# Altium PCB Plytka_srodkowa_ESP_SD.PcbDoc
Units mm, origin at the board's own origin, x right, y up, seen from the top; angles counter-clockwise.
Board outline 49 x 49 mm, 2 copper layers (Top Layer, Bottom Layer); 5 components, 16 nets, 50 pads, 53 vias.
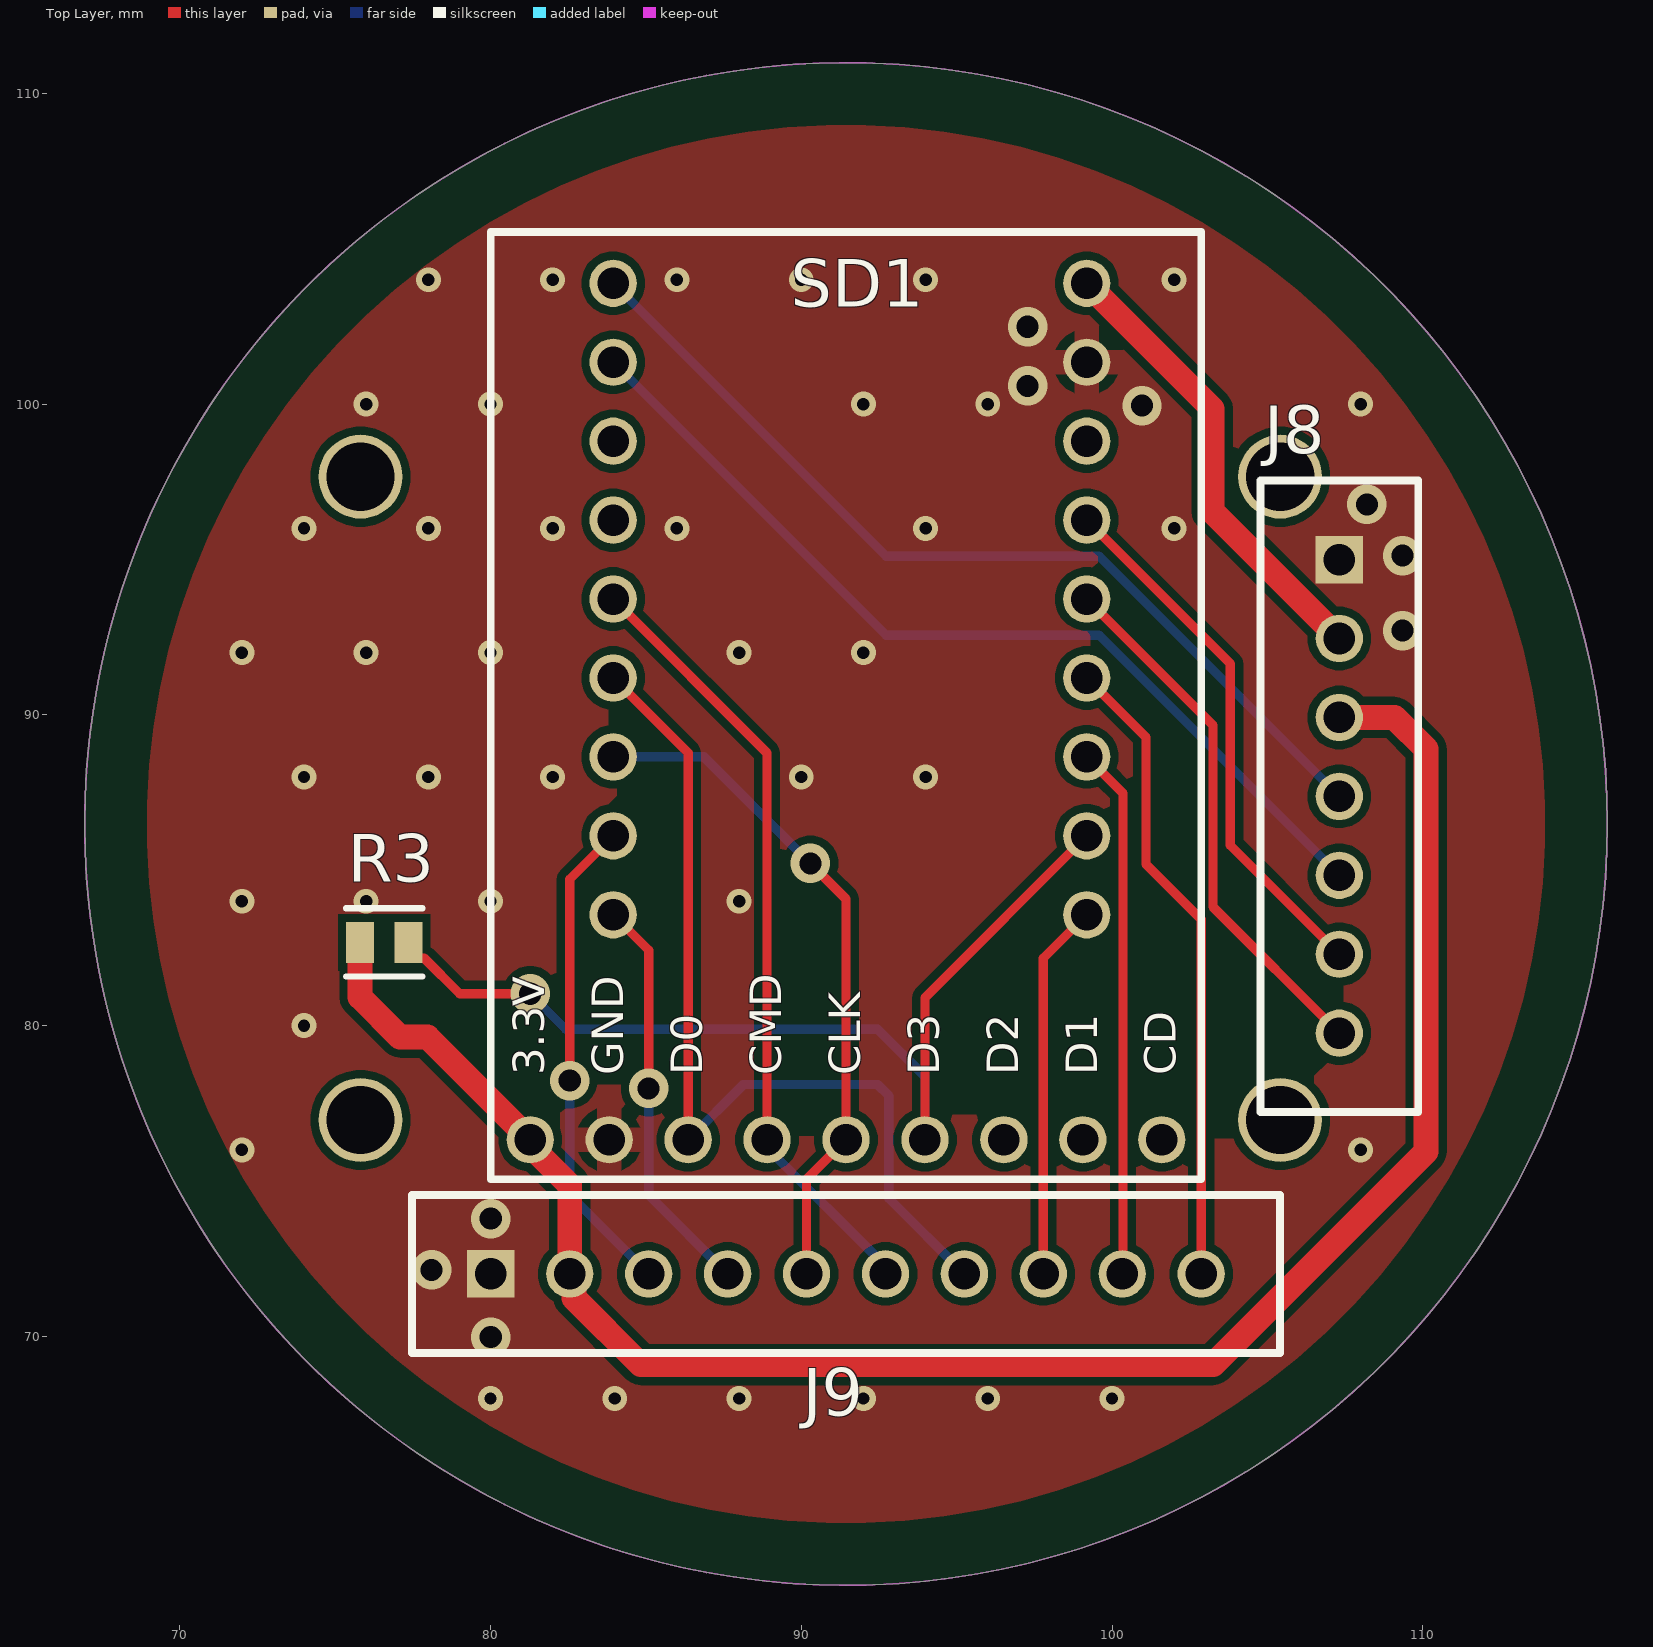
[diagram p0: Top Layer view]
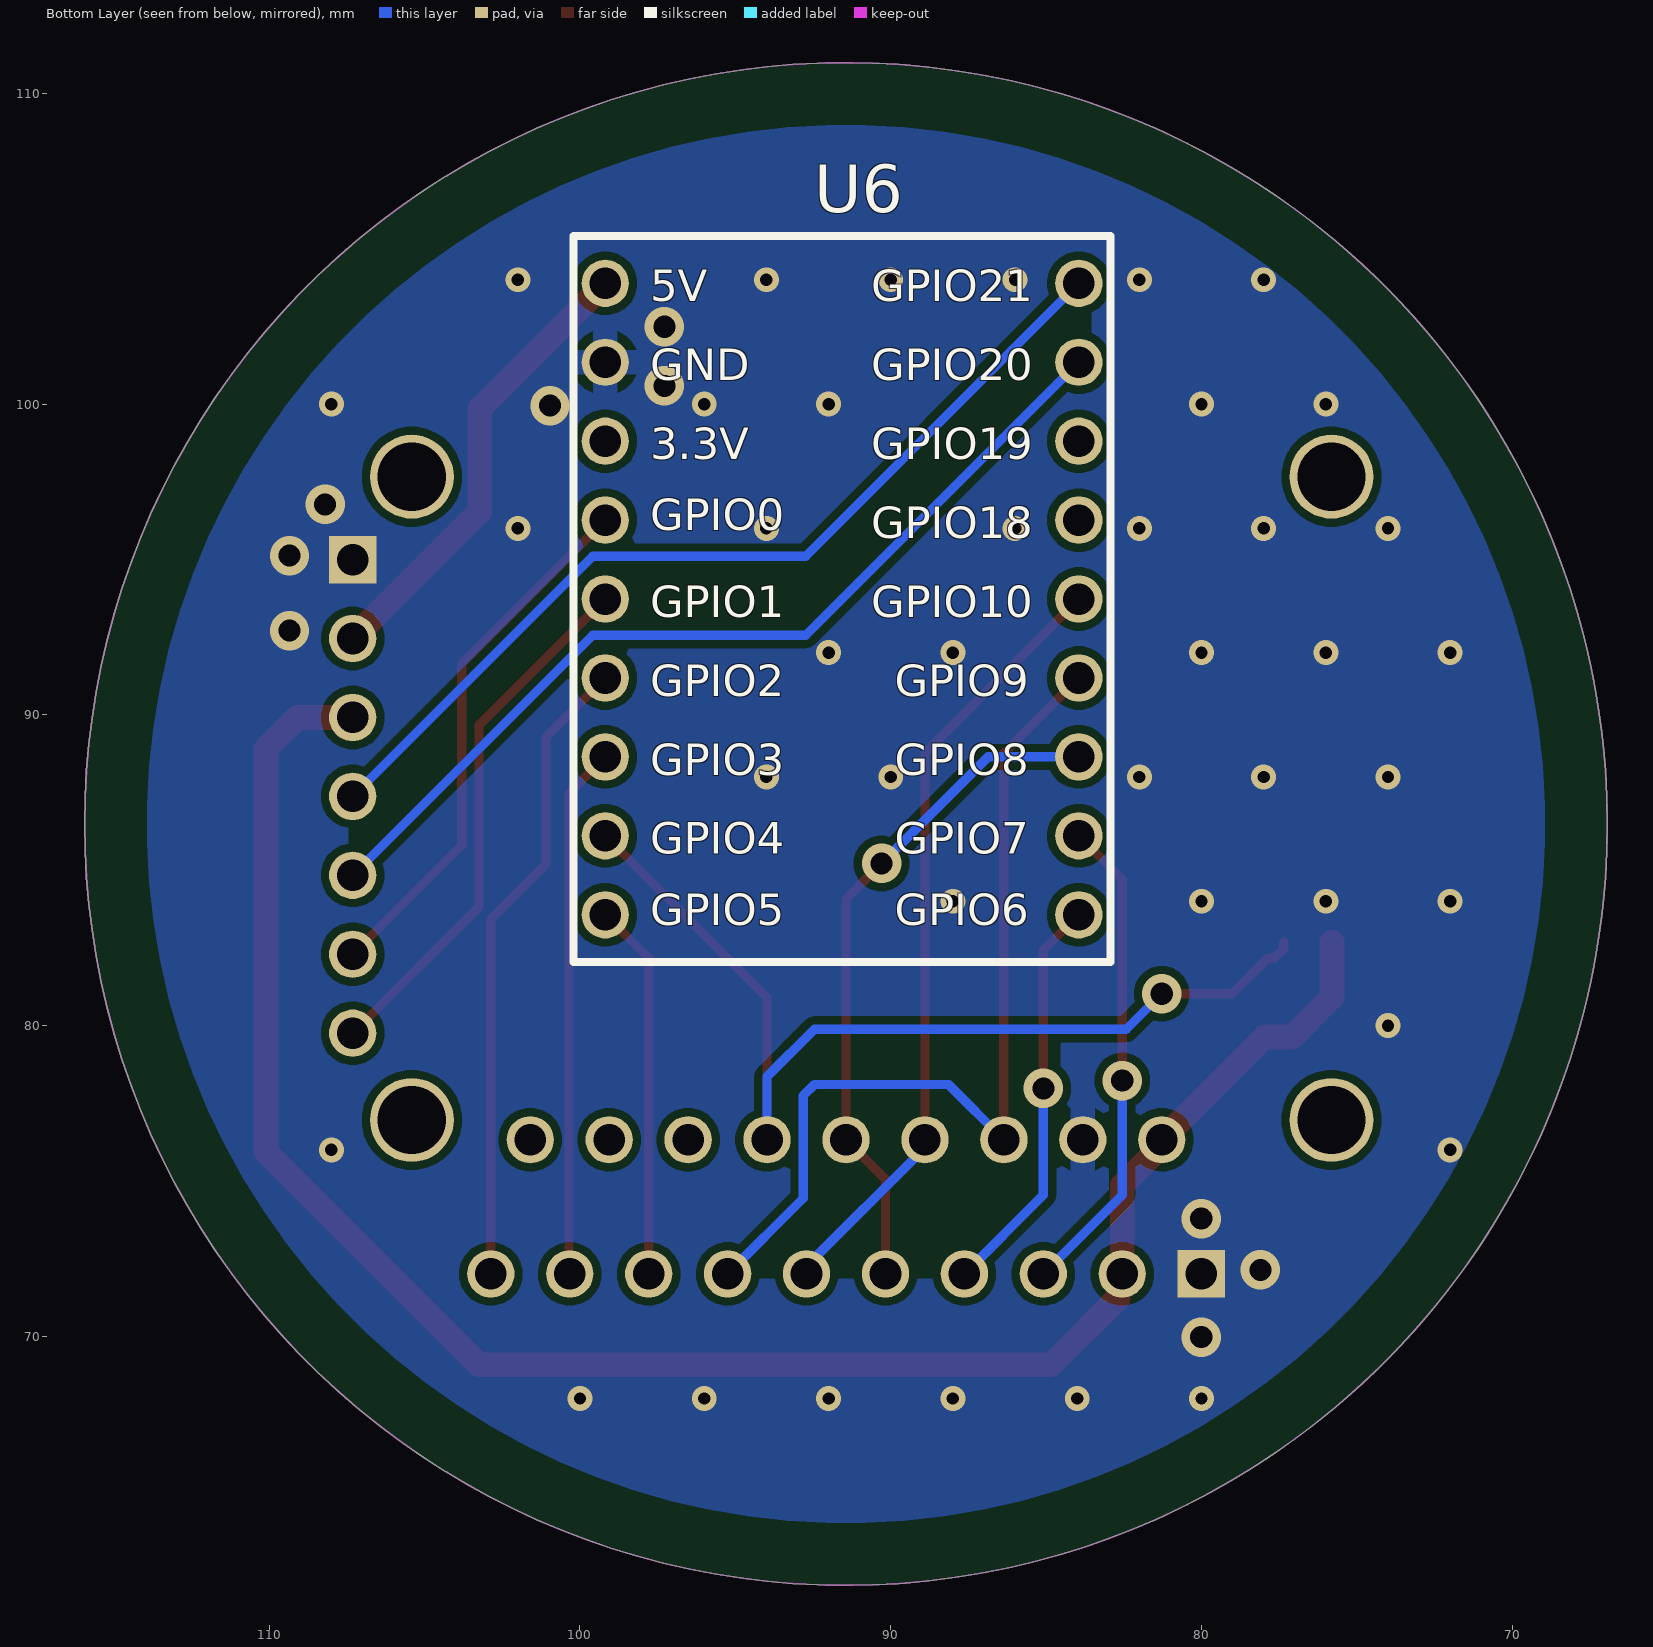
[diagram p1: Bottom Layer view, seen from below]

## Layer stack, top to bottom
Top Solder: solder mask 0.0102, Solder Resist, Dk 3.5
Top Layer: signal copper 0.0356
Dielectric 1: dielectric 0.32, FR-4, Dk 4.8
Bottom Layer: signal copper 0.0356
Bottom Solder: solder mask 0.0102, Solder Resist, Dk 3.5

## Board outline
66.94,86.487 ccw(c91.44,86.487) 91.44,61.987 ccw(c91.44,86.487) 115.94,86.487 ccw(c91.44,86.487) 91.44,110.987 ccw(c91.44,86.487)

## Design rules (kind name [scope] priority, off if disabled: settings)
AssemblyTestPointUsage AssemblyTestPointUsage_1 [All] p2:
AssemblyTestpoint AssemblyTestpoint_1 [All] p2: testpointundercomponent=TRUE minsize=1.016 maxsize=2.54 preferedsize=1.524 minholesize=0 maxholesize=1.016 preferedholesize=0.813 testpointgrid=0.025 usegrid=TRUE gridtolerance=0 allowsidetop=TRUE allowsidebottom=TRUE
BoardOutlineClearance [All] p1: gap=2 ignorepadtopadclearanceinfootprint=FALSE except(0: Text-OutlineEdge Text-CavityEdge Text-CutoutEdge Text-SplitBarrior Text-SplitContinuation; 0.5: Arc-OutlineEdge Arc-CavityEdge Arc-CutoutEdge Arc-SplitBarrior Arc-SplitContinuation Track-OutlineEdge Track-CavityEdge Track-CutoutEdge Track-SplitBarrior Track-SplitContinuation)
Clearance [All] p1: gap=0.254 ignorepadtopadclearanceinfootprint=FALSE
Clearance Clearance_1 [All] p2: gap=0.254 ignorepadtopadclearanceinfootprint=FALSE
ComponentClearance ComponentClearance_1 [All] p2: gap=0.254 collisioncheckmode=3 verticalgap=0.254 showdistances=FALSE
DiffPairsRouting DiffPairsRouting_1 [All] p2: maxlimit=0.254 minlimit=0.254 mostfreqgap=0.254 toplayer_minwidth=0.381 toplayer_maxwidth=0.381 toplayer_prefwidth=0.381 bottomlayer_minwidth=0.381 bottomlayer_maxwidth=0.381 bottomlayer_prefwidth=0.381 maxuncoupledlength=12.7
FabricationTestPointUsage FabricationTestPointUsage_1 [All] p2: valid=0 allowmultiple=FALSE
FabricationTestpoint FabricationTestpoint_1 [All] p2: side=3 testpointundercomponent=TRUE minsize=1.016 maxsize=2.54 preferedsize=1.524 minholesize=0 maxholesize=1.016 preferedholesize=0.813 testpointgrid=0.025 allowsidetop=TRUE allowsidebottom=TRUE usegrid=TRUE gridtolerance=0
FanoutControl Fanout_BGA_1 [IsBGA] p1: bgadir=Out bgaviamode=Centered fanoutstyle=Auto fanoutdirection=Alternating viagrid=0.025 // Fanout_BGA (Default Rule)
FanoutControl Fanout_BGA [IsBGA] p2: bgadir=Out bgaviamode=Centered fanoutstyle=Auto fanoutdirection=Alternating viagrid=0.025 // Fanout_BGA (Default Rule)
FanoutControl Fanout_LCC [IsLCC] p3: bgadir=Out bgaviamode=Centered fanoutstyle=Auto fanoutdirection=Alternating viagrid=0.025 // Fanout_LCC (Default Rule)
FanoutControl Fanout_LCC_1 [IsLCC] p4: bgadir=Out bgaviamode=Centered fanoutstyle=Auto fanoutdirection=Alternating viagrid=0.025 // Fanout_LCC (Default Rule)
FanoutControl Fanout_SOIC_1 [IsSOIC] p5: bgadir=Out bgaviamode=Centered fanoutstyle=Auto fanoutdirection=Alternating viagrid=0.025 // Fanout_SOIC (Default Rule)
FanoutControl Fanout_SOIC [IsSOIC] p6: bgadir=Out bgaviamode=Centered fanoutstyle=Auto fanoutdirection=Alternating viagrid=0.025 // Fanout_SOIC (Default Rule)
FanoutControl Fanout_Small_1 [(CompPinCount < 5)] p7: bgadir=Out bgaviamode=Centered fanoutstyle=Auto fanoutdirection=OutThenIn viagrid=0.025 // Fanout_Small (Default Rule)
FanoutControl Fanout_Small [(CompPinCount < 5)] p8: bgadir=Out bgaviamode=Centered fanoutstyle=Auto fanoutdirection=OutThenIn viagrid=0.025 // Fanout_Small (Default Rule)
FanoutControl Fanout_Default [All] p9: bgadir=Out bgaviamode=Centered fanoutstyle=Auto fanoutdirection=Alternating viagrid=0.025 // Fanout_Default (Default Rule)
FanoutControl Fanout_Default_1 [All] p10: bgadir=Out bgaviamode=Centered fanoutstyle=Auto fanoutdirection=Alternating viagrid=0.025 // Fanout_Default (Default Rule)
Height Height_1 [All] p2: minheight=0 maxheight=25.4 prefheight=12.7
HoleSize HoleSize_1 [All] p2: absolutevalues=TRUE maxlimit=2.54 minlimit=0.025 maxpercent=80.000 minpercent=20.000
HoleToHoleClearance HoleToHoleClearance_1 [All] p2: gap=0.254 allowstackedmicrovias=TRUE
LayerPairs LayerPairs_1 [All] p2: enforce=TRUE
MinimumSolderMaskSliver MinimumSolderMaskSliver_1 [All] p2: minsoldermaskwidth=0.254
NetAntennae NetAntennae_1 [All] p2: netantennaetolerance=0
PasteMaskExpansion PasteMaskExpansion_1 [All] p2: expansion=0
PlaneClearance PlaneClearance_1 [All] p2: clearance=0.508
PlaneConnect PlaneConnect_1 [All] p2: planeconnectstyle=Relief reliefexpansion=0.508 reliefentries=4 reliefconductorwidth=0.254 reliefairgap=0.254
PolygonConnect DirectConnect_Serwa [(InComponent('J8') or InComponent('J9')) and InNet('GND')] p1: connectstyle=Direct reliefconductorwidth=0.254 reliefentries=4 polygonreliefangle="90 Angle" airgapwidth=0.254
PolygonConnect PolygonConnect_J1 [All vs InComponent('U6') or InComponent('SD1')] p2: connectstyle=Relief reliefconductorwidth=0.8 reliefentries=4 polygonreliefangle="90 Angle" airgapwidth=0.3
PolygonConnect Relief_U4_Przetwornica [InComponent('U4') and InNet('GND')] p3: connectstyle=Relief reliefconductorwidth=0.6 reliefentries=4 polygonreliefangle="90 Angle" airgapwidth=0.254
PolygonConnect PolygonConnect_1 [All] p4: thpad.connectstyle=Relief thpad.reliefconductorwidth=0.254 thpad.reliefentries=4 thpad.polygonreliefangle="90 Angle" thpad.airgapwidth=0.254 smdpad.connectstyle=Relief smdpad.reliefconductorwidth=0.254 smdpad.reliefentries=4 smdpad.polygonreliefangle="90 Angle" smdpad.airgapwidth=0.254 via.connectstyle=Direct via.reliefconductorwidth=0.254 via.reliefentries=4 via.polygonreliefangle="90 Angle" via.airgapwidth=0.254
RoutingCorners RoutingCorners_1 [All] p2: cornerstyle=45-Degree minsetback=2.54 maxsetback=2.54
RoutingLayers RoutingLayers_1 [All] p2: top layer_v5=TRUE bottom layer_v5=TRUE
RoutingPriority RoutingPriority_1 [All] p2: routingpriority=0
RoutingTopology RoutingTopology_1 [All] p2: topology=Shortest
RoutingVias [All] p1: holewidth=0.4 width=0.8 viastyle="Through Hole" minholewidth=0.2 minwidth=0.45 maxholewidth=0.8 maxwidth=1.5
ShortCircuit ShortCircuit_1 [All] p2: allowed=FALSE
SilkToSilkClearance SilkToSilkClearance_1 [All] p2: silktosilkclearance=0.254
SilkToSolderMaskClearance SilkToSolderMaskClearance_1 [IsPad] p2: minsilkscreentomaskgap=0.254 clearancetoexposedcopper=TRUE
SolderMaskExpansion SolderMask_Vias_Tented [IsVia] p1: expansion=0 istentingtop=TRUE
SolderMaskExpansion SolderMaskExpansion_1 [All] p2: expansion=0 istentingtop=FALSE
SupplyNets "Schematic Supply Nets" [InNet('GND')] p1: voltage=0.000
SupplyNets "Schematic Supply Nets_1" [InNet('GND')] p2: voltage=0.000
UnRoutedNet UnRoutedNet_1 [All] p2:
UnpouredPolygon UnpouredPolygon_1 [All] p2:
Width Width_1 [InNet('VCC') or InNet('+5V') or InNet('+3.3V') or InNet('NetJ1_2') or InNet('NetD1_2') or InNet('NetJ3_1') or InNet('NetD1_1') or InNet('NetD2_1')] p1: maxlimit=1.2 minlimit=0.6 preferedwidth=0.8
Width Width_2 [All] p2: maxlimit=0.5 minlimit=0.2 preferedwidth=0.3
25 further rules are at their usual default settings.

## Components (designator, comment, footprint, x,y, rotation, side; value= is the part's Value field where it differs from the comment)
J8 "PrzejscieTHT" PrzejscieTHT 104.775,77.216 r0 top
J9 "PrzejscieTHT10" PrzejscieTHT10 105.41,69.469 r90 top
R3 "10kΩ" FP-CRGCQ0805-IPC_C 76.581,82.677 r0 top value=10KΩ
SD1 "Waveshare_3947" Waveshare_3947 102.87,75.057 r90 top
U6 "ESP32-C3-Zero" ESP32-C3-Zero 100.203,82.042 r180 bottom

## Footprints (in the part's own frame and the unit in brackets; to place one, negate y for a bottom-side part, rotate by r counter-clockwise, add the part's x,y. Pads: shape width x height; smd on the part's side, far side on the other; paste and mask are expansions set on the pad)
ESP32-C3-Zero [mil]
  round 60 hole 40: 1(40,860) 2(40,760) 3(40,660) 4(40,560) 5(40,460) 6(40,360) 7(40,260) 8(40,160) 9(40,60) 10(640,60) 11(640,160) 12(640,260) 13(640,360) 14(640,460) 15(640,560) 16(640,660) 17(640,760) 18(640,860)
  silkscreen extent 0,0 680,920
FP-CRGCQ0805-IPC_C [mm]
  rect 0.906x1.31 smd paste+0 mask+0: 1(-0.776,0) 2(0.776,0)
  silkscreen extent -1.23,-1.1 1.23,1.1, body extent -1.33,-0.8 1.33,0.8, height 0.25
PrzejscieTHT [mil]
  rect 60x60 hole 40: 1(100,700)
  round 60 hole 40: 2(100,600) 3(100,500) 4(100,400) 5(100,300) 6(100,200) 7(100,100)
  silkscreen extent 0,0 200,800
PrzejscieTHT10 [mil]
  rect 60x60 hole 40: 1(100,1000)
  round 60 hole 40: 2(100,900) 3(100,800) 4(100,700) 5(100,600) 6(100,500) 7(100,400) 8(100,300) 9(100,200) 10(100,100)
  silkscreen extent 0,0 200,1100
Waveshare_3947 [mil]
  round 60 hole 40: 1(50,850) 2(50,750) 3(50,650) 4(50,550) 5(50,450) 6(50,350) 7(50,250) 8(50,150) 9(50,50)
  silkscreen extent 0,0 1200,900

## Part data
R3: library part CMP-03211-002989-1, "CRGCQ 0805 10K 5%", Ambient Temperature Range High=+70°C, Manufacturer="TE Connectivity", Manufacturer Part Number=CRGCQ0805J10K, Package=CRGCQ0805, Power Rating=0.125W, Resistance=10KΩ, Temperature="-55°C to +155°C", Temperature Coefficient=±100ppm/°C, Temperature Range High=+155°C, Temperature Range Low=-55°C, Tolerance=0.05, Voltage Rating=150V, Automotive=Yes, Automotive Grade="Grade 914", Category=Res, ComponentLink2Description=Datasheet, ComponentLink2URL=https://www.te.com/commerce/DocumentDelivery/DDEController?Action=showdoc&DocId=Data+Sheet%7F1773204-3%7F1%7Fpdf%7FEnglish%7FENG_DS_1773204-3_1.pdf%7F4-2176341-923, Composition="Thick Film", Device Class L1="Passive Components", Device Class L2=Resistors, Device Class L3="Chip SMD Resistors", Digikey Description="CRGCQ 0805 10K 5%", Height=0.65mm, Ipc Land Pattern Name=RESC200125X55, Lead Free=Yes, Mouser Description="Res Thick Film 0805 10K Ohm 5% 0.125W(1/8W) ±100ppm/C Pad SMD Automotive T/R", Octopart=https://octopart.com/crgcq0805j10k-te+connectivity-91018201, RoHS=TRUE, Series=CRGCQ

## Free pads (board coordinates)
  round 2.7 hole 2.2: 53(105.41,97.663) 54(75.819,97.663) 55(75.819,76.962) 56(105.41,76.962)

## Via types
v1: diameter 0.8, hole 0.4, Top Layer to Bottom Layer, tented both sides, 40 vias
v2: diameter 1.27, hole 0.711, Top Layer to Bottom Layer, tented both sides, 13 vias

## Nets (pads, with @x,y where several pads share a name; then routed paths per layer and width w, separated by ;. In a path a pad name is that pad's centre, name@x,y a point inside that pad or via, vN(x,y) a via of type N, cw(c..) or ccw(c..) an arc to the next point about the centre after c; other vN are vias at no path point)
+3.3V: J8.3 J9.2 R3.1 SD1.1 | length 62.1
  Top Layer w0.8: R3.1 75.805,80.913 77.089,79.629 77.978,79.629 SD1.1 81.28,76.131 82.55,74.861 J9.2 82.689,71.87 82.689,71.235 84.836,69.088 103.251,69.088 110.109,75.946 110.109,88.9 109.093,89.916 J8.3
+5V: J8.2 U6.1 | length 14.8
  Top Layer w0.8: U6.1 103.225,99.848 103.225,96.546 J8.2
BUZZER: J8.7 U6.5 | length 17.3
  Top Layer w0.3: U6.5 103.251,89.662 103.251,83.82 J8.7
GND: J8.1 J9.1 SD1.2 U6.2
  other v1: 80,68 84,68 88,68 92,68 96,68 100,68 72,76 108,76 74,80 72,84 76,84 80,84 88,84 74,88 78,88 82,88 90,88 94,88 72,92 76,92 80,92 88,92 92,92 74,96 78,96 82,96 86,96 94,96 102,96 76,100 80,100 92,100 96,100 108,100 78,104 82,104 86,104 90,104 94,104 102,104
  other v2: 80.01,69.977 78.105,72.136 80.01,73.787 109.347,92.71 109.347,95.123 108.204,96.774 100.965,99.949 97.282,100.584 97.282,102.489
I2C_SCL: J9.3 U6.11 | length 15.7
  Top Layer w0.3: v2(82.55,78.232) 82.55,84.709 U6.11
  Bottom Layer w0.3: v2(82.55,78.232) 82.55,74.549 J9.3
I2C_SDA: J9.4 U6.10 | length 13.1
  Top Layer w0.3: U6.10 85.09,82.423 v2(85.09,77.978)
  Bottom Layer w0.3: v2(85.09,77.978) 85.09,74.549 J9.4
LORA_CS: J9.8 U6.9 | length 12.1
  Top Layer w0.3: J9.8 97.79,82.169 U6.9
LORA_DIO0: J9.10 U6.6 | length 20.7
  Top Layer w0.3: U6.6 101.094,89.279 101.094,85.194 102.87,83.418 J9.10
LORA_RST: J9.9 U6.7 | length 17.1
  Top Layer w0.3: U6.7 100.353,87.48 100.353,72.032 J9.9
SD_CS: R3.2 SD1.6 U6.8 | length 32.5
  Top Layer w0.3: R3.2 77.357,82.475 77.66,82.172 77.862,82.172 79.008,81.026 v2(81.28,81.026) ; SD1.6 93.98,80.899 U6.8
  Bottom Layer w0.3: v2(81.28,81.026) 82.423,79.883 92.456,79.883 93.98,78.359 SD1.6
Serwo_PWM1: J8.4 U6.18 | length 30.2
  Bottom Layer w0.3: U6.18 92.733,95.1 99.591,95.1 J8.4
Serwo_PWM2: J8.5 U6.17 | length 30.2
  Bottom Layer w0.3: U6.17 92.733,92.56 99.591,92.56 J8.5
SPI_MISO: J9.7 SD1.3 U6.13 | length 29.9
  Top Layer w0.3: U6.13 86.36,88.773 SD1.3
  Bottom Layer w0.3: SD1.3 88.138,78.105 92.456,78.105 92.814,77.747 92.814,74.445 J9.7
SPI_MOSI: J9.6 SD1.4 U6.14 | length 25.3
  Top Layer w0.3: U6.14 88.9,88.773 SD1.4
  Bottom Layer w0.3: SD1.4 88.9,76.073 92.71,72.263 J9.6
SPI_SCK: J9.5 SD1.5 U6.12 | length 22
  Top Layer w0.3: J9.5 90.17,75.057 SD1.5 91.44,84.074 v2(90.297,85.217)
  Bottom Layer w0.3: U6.12 86.868,88.646 v2(90.297,85.217)
Zapalnik: J8.6 U6.4 | length 17.3
  Top Layer w0.3: U6.4 103.805,91.648 103.805,85.806 J8.6
pads on no net: SD1.7 SD1.8 SD1.9 U6.3 U6.15 U6.16

## Polygon pours and split planes (outlines as drawn)
GND on Bottom Layer "GND_L02_P004" (solid, remove dead copper, pour order 4): 66.94,86.487 ccw(c91.44,86.487) 91.44,61.987 ccw(c91.44,86.487) 115.94,86.487 ccw(c91.44,86.487) 91.44,110.987 ccw(c91.44,86.487)
GND on Top Layer "GND_L01_P005" (solid, remove dead copper, pour order 5): 66.94,86.487 ccw(c91.44,86.487) 91.44,61.987 ccw(c91.44,86.487) 115.94,86.487 ccw(c91.44,86.487) 91.44,110.987 ccw(c91.44,86.487)

## Keep-outs
Keep-Out Layer:
  circle w0.05: c91.44,86.487 r24.5

## Other copper
Top Layer:
  pour cut-out: 107.246,81.483 106.691,81.483 106.691,81.581 106.362,81.91 106.362,82.666 103.848,85.181 103.771,85.104 103.663,85.104 103.663,83.991 106.945,80.709 107.385,80.709 107.449,80.772 107.449,81.28 107.449,80.772 107.449,81.28
  pour cut-out: 104.953,76.189 104.953,76.839 106.923,78.809 106.362,79.37 106.362,80.126 103.467,83.022 103.39,82.945 103.282,82.945 103.282,76.427 103.331,76.378 104.071,76.378 104.274,76.581 104.666,76.189
  pour cut-out: 83.813,89.662 84.016,89.459 84.571,89.459 84.963,89.067 84.963,88.323 84.27,87.63 84.081,87.63 84.081,87.39 83.813,87.122 83.882,87.053 84.437,87.053 84.963,86.527 84.963,85.685 84.431,85.153 83.577,85.153 82.962,84.538 82.962,84.291 83.089,84.291 83.162,84.218 83.457,84.513 84.012,84.513 84.081,84.582 84.284,84.379 84.571,84.379 84.571,84.281 84.9,83.952 84.9,83.152 85.502,82.549 85.502,78.767 85.559,78.767 85.748,78.577 85.823,78.653 85.948,78.653 85.948,88.602 84.317,90.233 83.877,90.233 83.813,90.17
  pour cut-out: 89.916,76.461 89.312,77.065 89.312,84.745 89.366,84.799 89.512,84.799 89.512,84.745 89.868,84.389 90.353,84.389 90.414,84.328 90.454,84.368 90.563,84.368 91.028,83.903 91.028,77.262 90.939,77.262 90.424,76.748 90.424,76.461
  pour cut-out: 83.439,78.115 83.261,78.293 83.261,78.778 83.205,78.778 82.962,79.021 82.962,82.841 83.089,82.841 83.162,82.914 83.457,82.619 84.012,82.619 84.081,82.55 84.144,82.613 84.317,82.613 84.678,82.252 84.678,78.572 84.201,78.095
  pour cut-out: 82.227,76.719 81.603,77.343 81.165,77.343 78.219,80.289 77.362,80.289 76.465,81.186 76.465,81.733 77.633,81.733 77.66,81.76 78.775,80.645 80.46,80.645 80.968,80.137 81.648,80.137 81.938,80.427 82.013,80.351 82.138,80.351 82.138,79.021 81.661,78.544 81.661,77.949 82.227,77.384
  pour cut-out: 99.741,84.419 99.835,84.513 99.941,84.513 99.941,85.159 99.848,85.253 99.673,85.253 99.51,85.09 98.88,85.09 98.817,85.153 94.392,80.728 94.392,77.262 94.514,77.14 95.994,77.14 96.197,77.343 96.654,77.343 96.723,77.274 97.01,77.274 97.178,77.106 97.261,77.189 97.378,77.189 97.378,82.169 98.234,83.025 98.234,83.952 98.563,84.281 98.563,84.379 99.118,84.379 99.321,84.582 99.483,84.419
  pour cut-out: 103.208,90.287 103.285,90.364 103.393,90.364 103.393,91.477 99.557,95.313 99.557,94.695 100.134,94.118 100.134,93.362 103.208,90.287 103.317,90.287 103.393,90.364
  pour cut-out: 102.654,84.216 102.763,84.216 102.839,84.292 102.839,89.491 99.557,92.773 99.321,92.537 99.321,92.202 99.608,92.202 100.203,91.607 100.203,90.879 100.14,90.816 101.474,89.481 101.474,89.311 101.506,89.279 101.506,85.365
Bottom Layer:
  pour cut-out: 98.24,92.972 98.171,93.592 98.171,94.147 98.512,94.488 98.44,94.56 98.44,94.688 92.607,94.688 84.361,102.933 83.561,102.933 83.555,102.939 83.555,102.293 84.437,102.293 84.894,101.836 84.894,100.982 92.904,92.972 98.334,93.172 98.334,93.065 98.334,93.697 98.171,93.86
  pour cut-out: 107.246,86.563 106.691,86.563 106.691,86.661 106.362,86.99 106.362,87.746 100.403,93.705 100.134,93.436 100.134,93.103 99.882,92.851 106.945,85.789 107.385,85.789 107.449,85.852 107.449,86.36 107.449,85.852 107.449,86.36
  pour cut-out: 84.544,78.689 84.544,79.413 84.486,79.471 85.207,79.471 85.207,78.867 85.029,78.689
  pour cut-out: 89.223,71.944 89.223,72.401 89.778,72.956 90.562,72.956 91.186,72.143 91.186,71.875 91.694,71.875 91.694,72.168 91.846,72.535 88.087,75.703 87.953,76.697 88.813,77.343 89.034,77.343 89.524,77.14 89.713,76.951 89.916,76.461 89.916,76.193 89.764,75.792 92.6,72.956 93.334,72.822 93.657,72.401 93.726,71.875 94.234,71.875 94.297,71.939 94.297,72.423 92.402,74.319 92.402,75.58 92.202,75.652 91.846,75.38 91.048,75.38 91.048,75.569 90.424,76.193 90.627,76.396 90.627,76.951 90.725,76.951 91.048,77.274 91.846,77.274 92.202,77.002 92.402,77.074 92.402,77.576 92.285,77.693 88.309,77.693 87.313,76.697 87.313,76.257 87.376,76.193 87.307,76.124 87.307,75.935 86.752,75.38 85.968,75.38 85.8,75.548 85.585,75.548 85.502,75.465 85.502,74.72 87.266,72.956 88.022,72.956 88.443,72.633 88.443,72.535 88.577,72.401 88.646,71.875 89.154,71.875 88.646,71.875 89.154,71.875
  pour cut-out: 85.207,78.867 85.55,78.524 85.801,78.524 85.801,78.039 85.979,77.861 85.746,77.628 85.746,77.339 85.868,77.216 85.932,77.28 86.774,77.28 87.98,78.486 92.614,78.486 93.226,77.873 93.226,77.274 93.317,77.274 93.396,77.194 93.501,77.299 93.568,77.299 93.568,78.188 92.285,79.471 85.248,79.471 85.217,79.502 85.207,79.492

## Silkscreen, mask and mechanical layers (free items; w line width, h text height)
Mechanical 1:
  circle w0.05: c91.44,86.487 r22.5

## Text inside footprints (layer, text, board x,y; h text height)
SD1: Top Overlay "3.3V" at 81.737,78.41 h1.02 r90; Top Overlay "GND" at 84.277,78.41 h1.02 r90; Top Overlay "D0" at 86.817,78.41 h1.02 r90; Top Overlay "CMD" at 89.357,78.41 h1.02 r90; Top Overlay "CLK" at 91.897,78.41 h1.02 r90; Top Overlay "D3" at 94.437,78.41 h1.02 r90; Top Overlay "D2" at 96.977,78.41 h1.02 r90; Top Overlay "D1" at 99.517,78.41 h1.02 r90; Top Overlay "CD" at 102.057,78.41 h1.02 r90
U6: Bottom Overlay "5V" at 97.739,103.302 h1.02; Bottom Overlay "GND" at 97.739,100.762 h1.02; Bottom Overlay "3.3V" at 97.739,98.222 h1.02; Bottom Overlay "GPIO0" at 97.739,95.936 h1.02; Bottom Overlay "GPIO1" at 97.739,93.142 h1.02; Bottom Overlay "GPIO2" at 97.739,90.602 h1.02; Bottom Overlay "GPIO3" at 97.739,88.062 h1.02; Bottom Overlay "GPIO4" at 97.739,85.522 h1.02; Bottom Overlay "GPIO5" at 97.739,83.236 h1.02; Bottom Overlay "GPIO6" at 89.865,83.236 h1.02; Bottom Overlay "GPIO7" at 89.865,85.522 h1.02; Bottom Overlay "GPIO8" at 89.865,88.062 h1.02; Bottom Overlay "GPIO9" at 89.865,90.602 h1.02; Bottom Overlay "GPIO10" at 90.627,93.142 h1.02; Bottom Overlay "GPIO18" at 90.627,95.682 h1.02; Bottom Overlay "GPIO19" at 90.627,98.222 h1.02; Bottom Overlay "GPIO20" at 90.627,100.762 h1.02; Bottom Overlay "GPIO21" at 90.627,103.302 h1.02